# Altium PCB DATALOGER_RevA.PcbDoc (part 3 of 3)
Units mil, origin at the board's own origin, x right, y up, seen from the top; angles counter-clockwise.
Board outline 3937.01 x 3149.61 mil, 2 copper layers (Top Layer, Bottom Layer), stack 62.19 mil thick; 129 components, 81 nets, 422 pads, 180 vias.
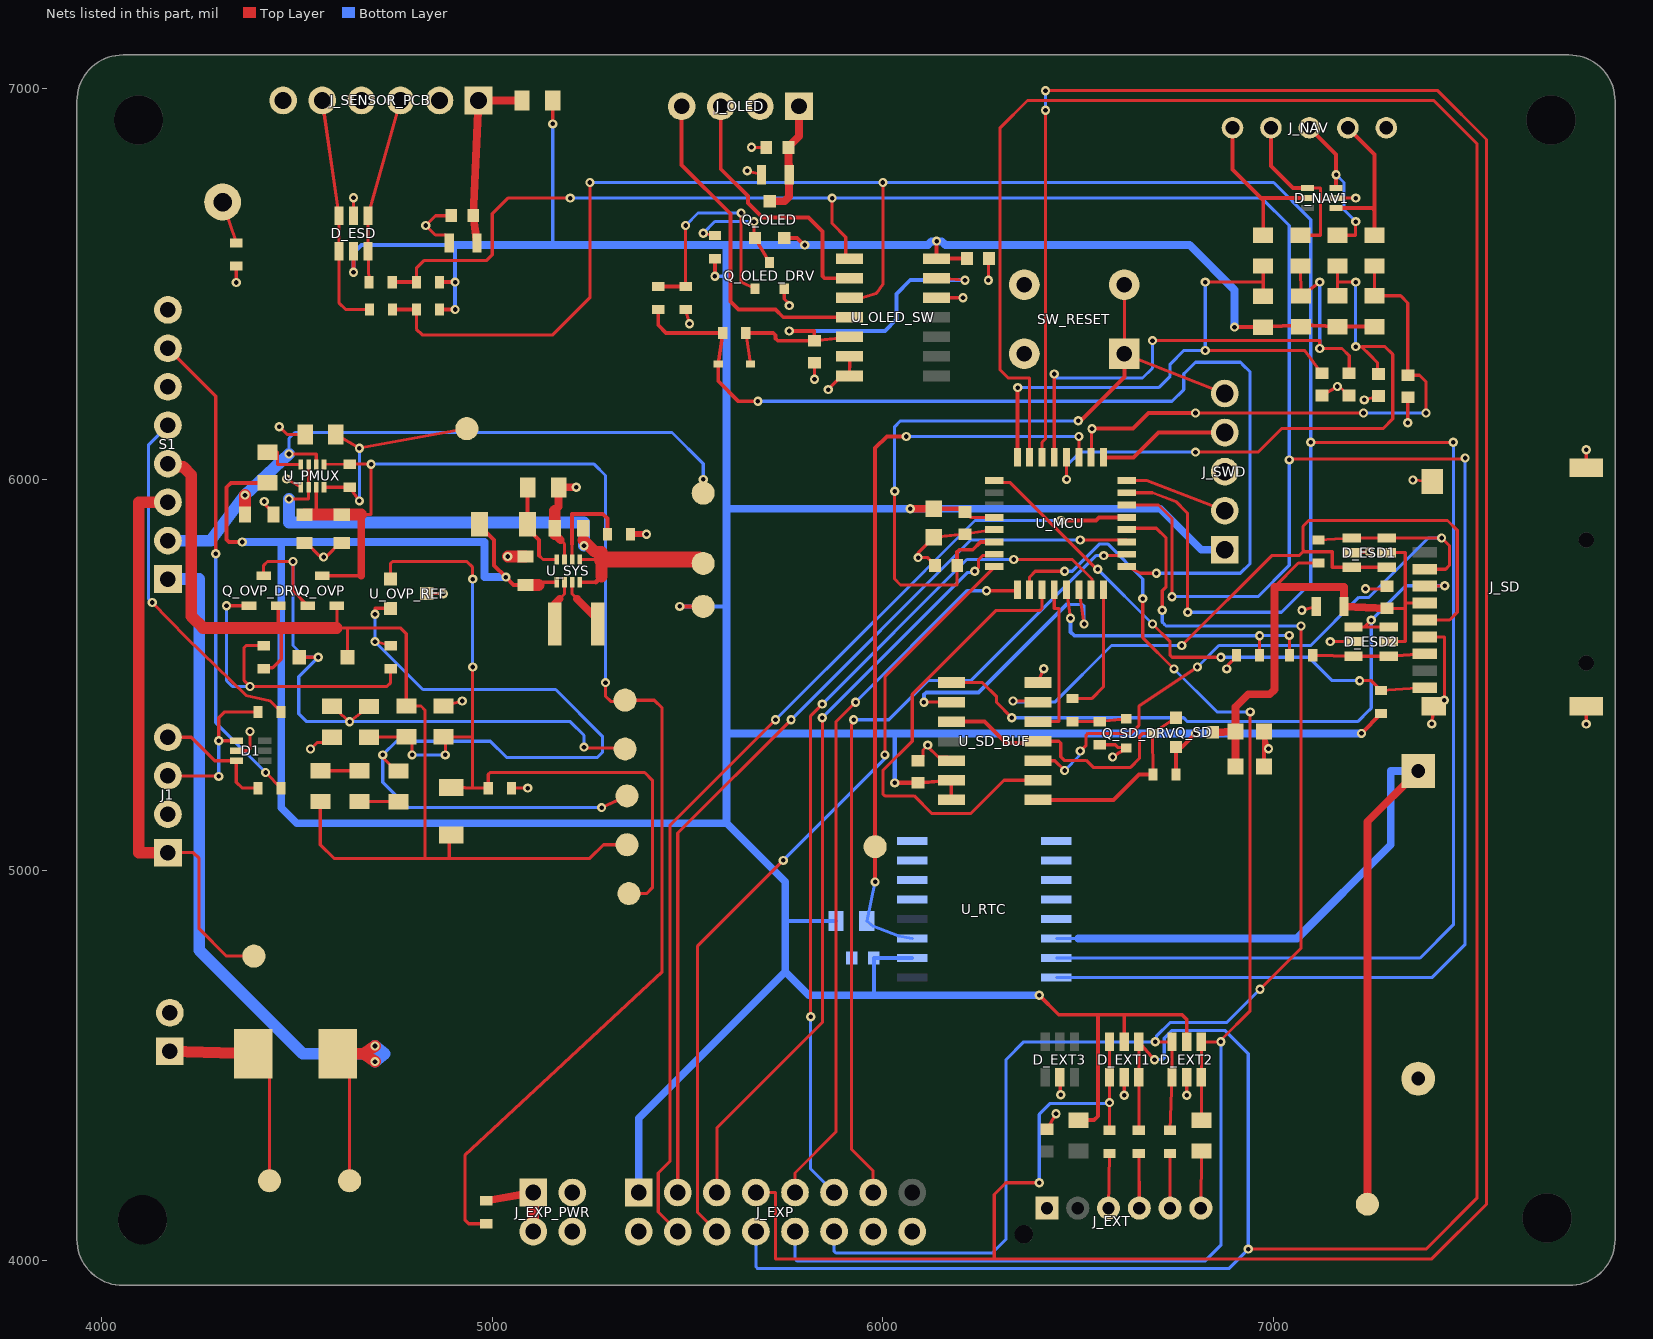
[diagram p2: the nets of this part, all layers, seen from the top]

## Via types
v1: diameter 23.62, hole 11.81, Top Layer to Bottom Layer, 180 vias

## Nets (pads, with @x,y where several pads share a name; then routed paths per layer and width w, separated by ;. In a path a pad name is that pad's centre, name@x,y a point inside that pad or via, vN(x,y) a via of type N, cw(c..) or ccw(c..) an arc to the next point about the centre after c; other vN are vias at no path point) (continued)
3V3_SYS: C_4066.1 C_BUF.2 C_MCU_BULK.2 C_MCU_HF.2 C_OUT.1 C_RTC.1 D_ESD.5 D_EXT1.5 D_EXT2.5 FB_SENSOR.1 J_EXP.1 J_SWD.1 Q_OLED.2 Q_SD.2 R_CD_PU.1 R_EXT_REF.1 R_FB_TOP.1 R_GATE.2 R_OLED_GATE.2 R_PULL1.2 R_PULL2.2 R_PULL3.2 R_PULL4.2 R_RTC_INT_PU.1 R_SCL_PU.2 R_SDA_PU.2 R_ST_PU.1 TP_3V3_SYS.1 U_MCU.4 U_OLED_SW.14 U_RTC.2 U_SD_BUF.13 U_SD_BUF.14 U_SYS.1 | length 15307.8
  Top Layer w8: 5125,5736.73 U_SYS.1@5165.31,5736.73 ; C_MCU_HF.2@6210,5916.69 6223.7,5902.99 U_MCU.4@6285,5902.99
  Top Layer w10: v1(4360,5840) 4325.86,5840 4320,5845.86 4320,5980 4331.26,5991.26 R_ST_PU.1@4425,5991.26 ; v1(4645,6530) D_ESD.5@4645,6584.45 ; R_SDA_PU.2@4865,6435 v1(4905,6435) ; R_SCL_PU.2@4865,6505 v1(4905,6505) ; R_FB_TOP.1@4967.95,5885 4965,5885 5005,5845 5005,5780 v1(5035,5750) 5055,5730 C_OUT.1@5085,5730 ; v1(5155,6910) FB_SENSOR.1@5155,6970 ; v1(5480,5675) TP_3V3_SYS.1@5540,5675 ; v1(5570,6520) R_OLED_GATE.2@5570,6565 ; Q_OLED.2@5747.4,6617.76 5779.84,6617.76 5797.6,6600 v1(5800,6600) ; C_BUF.2@6090,5223.31 U_SD_BUF.13@6175,5230 U_SD_BUF.14@6175,5180 ; v1(6137.44,6610) U_OLED_SW.14@6137.44,6565 C_4066.1@6215,6565 ; v1(6400,4680) 6450,4630 6550,4630 ; R_EXT_REF.1@6500,4360 6540,4360 6550,4370 6550,4630 ; D_EXT1.5@6617.6,4560.55 6617.6,4630 ; R_GATE.2@6750,5245 Q_SD.2@6750,5315.2 6765,5315.2 v1(6800,5350) ; D_EXT2.5@6777.6,4560.55 6777.6,4617.4 6765,4630 6617.6,4630 ; v1(6900,6390) R_PULL4.2@6973.43,6390 ; R_PULL4.2@6973.43,6390 6994.02,6391.08 7049.41,6394 R_PULL3.2@7070,6390.63 ; R_PULL3.2@7068.43,6395 7070.17,6394.93 R_PULL2.2@7163.43,6391.26 R_PULL1.2@7258.43,6391.26 ; v1(7225,5350) R_CD_PU.1@7275,5400.94 ; 6550,4630 6617.6,4630
  Top Layer w12: 5118.27,5730 5125,5736.73 ; v1(6030,5223.31) C_BUF.2@6090,5223.31 ; C_MCU_BULK.2@6130,5925 6201.69,5925 C_MCU_HF.2@6210,5916.69
  Top Layer w20: v1(6070,5925) C_MCU_BULK.2@6130,5925
  Top Layer w30: C_OUT.1@5085,5730 5118.27,5730
  Bottom Layer w10: v1(4645,6530) 4645,6580 4665,6600 4905,6600 v1(4905,6505) v1(4905,6435) ; 5155,6600 v1(5155,6910) ; v1(5480,5675) 5600,5675 ; v1(5570,6520) 5600,6520 ; 5750,4870 R_RTC_INT_PU.1@5880,4870 ; 5976.69,4680 C_RTC.1@5976.69,4775 U_RTC.2@6075,4775
  Bottom Layer w12: v1(6030,5223.31) 6030,5350
  Bottom Layer w20: v1(4360,5840) 4460,5840 ; 4905,6600 5155,6600 5600,6600 ; v1(5035,5750) 4980,5750 4980,5840 4460,5840 ; J_EXP.1@5375,4175 5375,4365 5750,4740 ; v1(6400,4680) 5976.69,4680 5810,4680 5750,4740 ; J_SWD.1@6875,5820 6815,5820 6710,5925 v1(6070,5925) 5600,5925 ; v1(6900,6390) 6900,6485 6785,6600 6160,6600 6150.69,6609.31 6138.13,6609.31 v1(6137.44,6610) 6136.75,6609.31 6124.31,6609.31 6115,6600 5600,6600 ; v1(7225,5350) v1(6800,5350) 6030,5350 5600,5350 ; 4460,5840 4460,5160 4500,5120 5600,5120 ; 5600,5120 5750,4970 5750,4870 5750,4740 ; 5600,5120 5600,5350 ; 5600,5350 5600,5675 5600,5925 ; 5600,5925 5600,6520 5600,6600
BAT_FUSED: F1.1 S1.1 TP_BAT_FUSED.1 | length 2140.9
  Top Layer w8: F1.1@4605,4530 4635,4530 TP_BAT_FUSED.1@4635,4205
  Top Layer w30: F1.1@4635,4530 4670,4530 ; v1(4700,4510) 4670,4530 ; v1(4700,4550) 4670,4530
  Bottom Layer w30: S1.1@4170,5745 4250,5745 4250,4795 4515,4530 4725,4530 ; v1(4700,4510) 4725,4530 ; v1(4700,4550) 4725,4530
BAT_RAW: BT1.1 F1.2 TP_BAT_RAW.1 | length 580.1
  Top Layer w8: F1.2@4388.46,4530 4430,4530 TP_BAT_RAW.1@4430,4205
  Top Layer w30: BT1.1@4175,4536.57 F1.2@4388.46,4530
BAT_SW: C1.1 S1.2 TP_BAT_SW.1 U_PMUX.6 | length 1770.5
  Top Layer w8: v1(4480,6065) 4549.69,6065 U_PMUX.6@4549.69,6038.27 ; TP_BAT_SW.1@5540,5965 v1(5540,6000)
  Top Layer w30: C1.1@4367.17,5910 v1(4367.16,5960)
  Bottom Layer w8: v1(4480,6065) 4480,6105 4495,6120 5460,6120 5540,6040 v1(5540,6000)
  Bottom Layer w30: S1.2@4170,5843.43 4280,5843.43 v1(4367.16,5960) v1(4480,6065)
CC1_RD_RET: R_CC1.2 S1.5 | length 918.7
  Top Layer w8: v1(4130,5685) 4217.5,5595 4370,5447.5 4432.5,5432.5 R_CC1.2@4459.53,5405
  Bottom Layer w8: v1(4130,5685) 4120,5695 4120,6087.5 S1.5@4170,6138.7
CC2_RD_RET: R_CC2.2 S1.7 | length 1245.3
  Top Layer w8: S1.7@4170,6335.55 4292.5,6213.05 v1(4292.5,5810) ; v1(4420,5250) R_CC2.2@4459.53,5210
  Bottom Layer w8: v1(4292.5,5810) 4292.5,5377.5 v1(4420,5250)
EXP_ID_ADC: J_EXP.9 U_MCU.9 | length 1855.4
  Top Layer w8: J_EXP.9@5775,4175 5775,4225 5880,4330 5880,5380 v1(5930,5430) ; v1(6265,5715) 6345,5715 U_MCU.9@6344.06,5717.95
  Bottom Layer w8: v1(5930,5430) 6215,5715 v1(6265,5715)
FB_3V3: R_FB_BOTTOM.2 R_FB_TOP.2 U_SYS.8 | length 238.1
  Top Layer w8: 5120,5805 5130,5795 U_SYS.8@5165.31,5795
  Top Layer w10: R_FB_BOTTOM.2@5091.26,5980 5090,5980 R_FB_TOP.2@5090,5885 5090,5875 5120,5845 5120,5805
GND: BT1.2 BT2.2 C1.2 C_4066.2 C_BUF.1 C_DELAY.2 C_EXT_REF.2 C_FIL1.2 C_FIL2.2 C_FIL3.2 C_FIL4.2 C_IN.1 C_MCU_BULK.1 C_MCU_HF.1 C_NRST.2 C_OLED_BULK.1 C_OLED_HF.1 C_OUT.2 C_RTC.2 C_SD_BULK1.1 C_SD_BULK2.1 C_SD_HF.1 C_SD_MID.1 C_SENSOR_BULK.1 C_SENSOR_HF.1 C_USB1.1 C_USB2.1 D1.2 D_ESD1.2 D_ESD2.2 D_ESD.2 D_EXT1.2 D_EXT2.2 D_EXT3.2 D_NAV1.2 J1.2 J_EXP.2 J_EXP.14 J_EXP.16 J_EXP_PWR.3 J_EXP_PWR.4 J_EXT.1 J_NAV.1 J_OLED.2 J_SD.6 J_SD.10 J_SENSOR_PCB.2 J_SENSOR_PCB.4 J_SENSOR_PCB.6 J_SWD.3 Q_OLED_DRV.2 Q_SD_DRV.2 R_BASE_PD.1 R_BOTTOM_A.1 R_BOTTOM_B.2 R_FB_BOTTOM.1 R_GATE_PD.2 R_MISO_PD.2 R_MODE.1 R_OLED_BASE_PD.2 R_PR_BOTTOM.2 R_SHIELD.1 S1.6 S1.8 SW_RESET.3 SW_RESET.4 U_MCU.5 U_OLED_SW.6 U_OLED_SW.7 U_OLED_SW.12 U_OVP_REF.3 U_PMUX.1 U_RTC.5 U_RTC.6 U_RTC.7 U_RTC.8 U_RTC.9 U_RTC.10 U_RTC.11 U_RTC.12 U_RTC.13 U_SD_BUF.7 U_SD_BUF.12 U_SYS.7 | length 3385.7
  Top Layer w8: D1.2@4345,5305.59 4375,5305.59 4380,5310.59 v1(4380,5355) ; v1(4345,6503.94) R_SHIELD.1@4345,6545.94 ; v1(4416.49,5943.51) 4419.48,5940.52 4419.48,5935.44 4440,5914.92 C1.2@4440,5910 ; v1(4455,6135) 4475,6115 R_PR_BOTTOM.2@4521.26,6115 ; v1(4474.08,6001.24) U_PMUX.1@4510.31,5980 ; C_USB1.1@4524.92,5837.16 4557.6,5804.48 4565.52,5804.48 v1(4568.51,5801.49) 4571.49,5804.48 4577.4,5804.48 4610.08,5837.16 C_USB2.1@4615,5837.17 ; v1(4535,5310) 4551.84,5326.84 4576.21,5326.84 R_GATE_PD.2@4590,5340.63 ; D_ESD.2@4645,6675 v1(4645,6721) ; U_OVP_REF.3@4832.52,5707.6 v1(4874.52,5707.6) ; R_BOTTOM_A.1@4875,5420 v1(4923.3,5432.94) ; C_SENSOR_BULK.1@4890,6605 4890,6617.8 4882.19,6625.61 4854.39,6625.61 v1(4830,6650) 4855,6675 C_SENSOR_HF.1@4895,6675 ; R_BOTTOM_B.2@5049.06,5210 v1(5091.06,5210) ; 5175,5845 5185,5835 U_SYS.7@5185,5795 ; R_OLED_BASE_PD.2@5495,6435 v1(5504.84,6398.3) ; v1(5652.86,6789.84) C_OLED_BULK.1@5689.57,6780 ; v1(5663.65,6850) C_OLED_HF.1@5701.65,6850 ; Q_OLED_DRV.2@5747.4,6488.07 5747.4,6461.83 5760,6449.23 v1(5760,6445) ; v1(5825,6256.31) C_DELAY.2@5825,6298.31 ; v1(5860,6230) 5860,6230.67 U_OLED_SW.7@5887.17,6257.83 ; U_OLED_SW.7@5915,6265 5915,6257.83 U_OLED_SW.7@5887.17,6257.83 ; U_OLED_SW.6@5915,6315 5915,6286.18 5914.92,6286.09 5914.92,6274.78 5898.48,6258.34 5887.17,6258.34 U_OLED_SW.7@5887.17,6257.83 ; C_BUF.1@6090,5280 6091.77,5280 6102.73,5290.96 6102.73,5307.5 6112.89,5317.66 6112.89,5317.89 v1@6115,5315.79 ; v1(6115,5320) v1@6115,5315.79 ; C_NRST.2@6133.31,5780 6133.31,5781.77 6115.08,5800 v1(6090,5800) 6090,5812.17 C_MCU_BULK.1@6130,5852.17 C_MCU_HF.1@6210,5860 U_MCU.5@6285,5871.5 ; U_OLED_SW.12@6137.44,6465 v1(6205,6465) ; U_SD_BUF.12@6175,5280 6165.22,5289.78 6141.01,5289.78 v1@6115,5315.79 ; v1(6270,6510) 6270,6563.31 C_4066.2@6271.69,6565 ; U_SD_BUF.7@6397.44,5480 v1(6411.4,5515.34) ; C_EXT_REF.2@6420,4336.69 v1(6443,4376.53) ; D_EXT3.2@6452.6,4470 6453.8,4468.8 6453.8,4426.2 v1(6455,4425) ; R_BASE_PD.1@6555,5320.94 6594.68,5320.94 6601.98,5313.65 6622.02,5313.65 Q_SD_DRV.2@6623.07,5312.6 v1(6587.92,5289.61) ; v1(6617.6,4424) D_EXT1.2@6617.6,4470 ; v1(6777.6,4424) D_EXT2.2@6777.6,4470 ; v1(6880,5515) 6882.99,5517.99 6882.99,5524.05 6905,5546.06 R_MISO_PD.2@6905,5550 ; C_SD_BULK1.1@6975,5355 v1(6986.91,5310.57) ; v1(7072.43,5665.16) C_SD_MID.1@7109.13,5675 ; C_FIL4.2@7123.43,6215 v1(7163.26,6238) 7168.65,6238 7191.65,6215 C_FIL3.2@7193.43,6215 ; v1(7145,5585) D_ESD2.2@7204.45,5585 ; D_NAV1.2@7159.84,6720 v1(7210,6720) ; D_ESD1.2@7199.45,5812.6 7200.65,5813.8 7243.8,5813.8 v1(7245,5815) ; v1(7231.72,6203.51) C_FIL2.2@7268.43,6213.35 ; v1(7235,5720) 7283.31,5720 C_SD_HF.1@7290,5726.69 ; v1(7343.43,6145) C_FIL1.2@7343.43,6210 ; v1(7356.45,5998.53) J_SD.10@7406.3,5994.69 ; J_SD.6@7386.61,5597.05 7436.88,5597.05 v1(7436.88,5434.65) ; v1(7404.67,5374.22) J_SD.10@7410.24,5419.88 ; v1(7800,5373.88) J_SD.10@7800,5419.88 ; J_SD.10@7800,6030.12 v1(7800,6076.12)
  Top Layer w10: C_SD_BULK2.1@6975,5265 C_SD_BULK1.1@6975,5355
  Top Layer w15: R_MODE.1@5354.06,5860 v1(5395,5860)
  Top Layer w20: C_IN.1@5160,5860 5175,5845 ; 5160,5920 5170,5930 R_FB_BOTTOM.1@5170,5980 v1(5215,5980)
  Top Layer w30: v1(5040,5802.83) C_OUT.2@5085,5802.83 ; C_IN.1@5160,5860 C_IN.1@5160,5875 5160,5920
I2C1_SCL: D_EXT1.1 D_EXT1.6 J_EXP.7 R_EXT_SCL.2 U_MCU.30 | length 7832.6
  Top Layer w8: J_EXP.7@5675,4175 5725,4175 5725,4005 6285,4005 ; v1(6400,4200) 6314.69,4200 6310,4195.31 6310,4195 6285,4170 6285,4005 ; U_MCU.30@6407.05,6056.54 6407,6095 6416,6104 v1(6416,6945) ; v1(6416,6995) 7420,6995 7545,6870 7545,4145 7405,4005 6285,4005 ; R_EXT_SCL.2@6580,4334.06 v1(6580,4405) 6580.1,4405.1 6580.1,4469.9 D_EXT1.1@6580.2,4470 D_EXT1.6@6580.2,4560.55
  Bottom Layer w8: v1(6400,4200) 6400,4375 6428.19,4403.19 6578.19,4403.19 v1(6580,4405) ; v1(6416,6945) v1(6416,6995)
I2C1_SDA: D_EXT1.3 D_EXT1.4 J_EXP.8 R_EXT_SDA.1 U_MCU.31 | length 8025.9
  Top Layer w8: U_MCU.31@6375.55,6056.54 6375,6260 6320,6260 6300,6280 6300,6900 6370,6970 7410,6970 7520.31,6859.69 7520.31,4160.31 7390,4030 v1(6935,4030) ; R_EXT_SDA.1@6655,4334.06 D_EXT1.3@6655,4470 D_EXT1.4@6655,4560.55 v1(6695,4515)
  Bottom Layer w8: J_EXP.8@5675,4075 5675,3984.69 5679.69,3980 6885,3980 v1(6935,4030) 6935,4530 6875,4590 6740,4590 6720,4570 6720,4519.69 6715.31,4515 v1(6695,4515)
I2C2_SCL: R_SCL_PU.1 R_SCL_SER.2 U_MCU.22 U_OLED_SW.1 U_RTC.16 | length 6982.5
  Top Layer w8: R_SCL_PU.1@4805.94,6505 4805.94,6540.94 4825,6560 4985,6560 5000,6575 5000,6680 5040,6720 v1(5200,6720) ; v1(5870,6720) 5870,6655 5905,6620 5905,6574.78 U_OLED_SW.1@5915,6565 ; U_MCU.22@6623.58,5934.49 6705.51,5934.49 6740,5900 v1(6740,5700) ; v1(7040,6050) 7042.5,6052.5 7487.5,6052.5 v1(7490,6055)
  Top Layer w10: R_SCL_SER.2@4744.06,6505 R_SCL_PU.1@4805.94,6505
  Bottom Layer w8: v1(5200,6720) v1(5870,6720) 6970,6720 7040,6650 7040,5780 6960,5700 v1(6740,5700) ; U_RTC.16@6443.9,4725 7405,4725 7490,4810 v1(7490,6055)
I2C2_SDA: R_SDA_PU.1 R_SDA_SER.2 U_MCU.23 U_OLED_SW.3 U_RTC.15 | length 7492.6
  Top Layer w8: R_SDA_PU.1@4805.94,6435 4805.94,6384.69 4820.63,6370 5155,6370 5250,6465 v1(5250,6760) ; U_OLED_SW.3@5915,6465 5945.45,6464.84 5981.96,6475.58 5983.8,6477.42 6000,6499.07 v1(6000,6760) ; U_MCU.23@6623.58,5965.98 6690,5965.98 6748.98,5943.06 6750.54,5942.45 6774.9,5918.1 6780,5912.99 v1(6780,5660) ; v1(7095,6095) v1(7460,6095)
  Top Layer w10: R_SDA_SER.2@4745,6435 R_SDA_PU.1@4805.94,6435
  Bottom Layer w8: v1(5250,6760) v1(6000,6760) 7000,6760 7095,6665 v1(7095,6095) 7095,5735 7020,5660 v1(6780,5660) ; U_RTC.15@6443.9,4775 7375,4775 7460,4860 v1(7460,6095)
JEXT_CTRL_RAW: J_EXT.5 R_EXT_CTRL.2 | length 140
  Top Layer w8: J_EXT.5@6734.96,4135 R_EXT_CTRL.2@6735,4275
JEXT_IN_RAW: J_EXT.6 R_EXT_IN.2 | length 146.3
  Top Layer w8: J_EXT.6@6813.7,4135 R_EXT_IN.2@6815,4281.26
JEXT_SCL_RAW: J_EXT.3 R_EXT_SCL.1 | length 140
  Top Layer w8: J_EXT.3@6577.48,4135 R_EXT_SCL.1@6580,4275
JEXT_SDA_RAW: J_EXT.4 R_EXT_SDA.2 | length 140
  Top Layer w8: R_EXT_SDA.2@6655,4275 J_EXT.4@6656.22,4135
KEY_BACK: C_FIL4.1 R_PULL4.1 R_SER4.2 U_MCU.32 | length 1444.9
  Top Layer w8: v1(6825,6330) 7080,6330 C_FIL4.1@7123.43,6271.69 ; v1(6825,6505) 6973.43,6505 ; R_PULL4.1@6973.43,6468.74 6973.43,6505 ; R_SER4.2@6973.43,6546.26 6973.43,6505
  Top Layer w10: U_MCU.32@6344.06,6056.54 6344.53,6057.01 6344.53,6234.53 v1(6345,6235)
  Bottom Layer w8: v1(6345,6235) 6705.58,6235 6735,6264.42 6735,6295.19 6769.81,6330 v1(6825,6330) v1(6825,6505)
KEY_DOWN: C_FIL2.1 R_PULL2.1 R_SER2.2 U_MCU.28 | length 1619
  Top Layer w8: v1(6470.04,6000) U_MCU.28@6470.04,6056.54 ; v1(6800,6070) 6960,6070 7020,6130 7280,6130 7305,6155 7305,6320 7285,6340 7226.34,6340 ; R_PULL2.1@7163.43,6470 7163.43,6505 ; R_SER2.2@7163.43,6546.26 7163.43,6505 ; v1(7210,6340) 7211.34,6338.66 7226.34,6338.66 7245,6320 7265.95,6299.04 7265.95,6272.51 C_FIL2.1@7268.43,6270.04 ; v1(7210,6505) 7163.43,6505
  Bottom Layer w8: v1(6470.04,6000) 6470.04,6035.04 6505,6070 v1(6800,6070) ; v1(7210,6340) v1(7210,6505)
KEY_SET: C_FIL3.1 R_PULL3.1 R_SER3.2 U_MCU.29 | length 1439.4
  Top Layer w8: U_MCU.29@6438.54,6056.54 v1(6438.54,6270) ; v1(6690,6355.4) 7118,6355.4 v1(7118,6335) 7175,6335 7193.43,6316.57 C_FIL3.1@7193.43,6271.69 ; R_SER3.2@7068.43,6546.26 R_PULL3.1@7070,6469.37 v1(7118,6505)
  Bottom Layer w8: v1(6438.54,6270) 6438.54,6259.54 6664.54,6259.54 6690,6285 v1(6690,6355.4) ; v1(7118,6335) v1(7118,6505)
KEY_UP: C_FIL1.1 R_PULL1.1 R_SER1.2 U_MCU.26 | length 1433.1
  Top Layer w8: U_MCU.26@6533.03,6056.54 6534.02,6057.52 6534.02,6129.02 v1(6535,6130) ; v1(6800,6170) v1(7230,6170) ; R_SER1.2@7258.43,6546.26 R_PULL1.1@7258.43,6470 7325,6470 7343.43,6451.57 C_FIL1.1@7343.43,6266.69 7373.31,6266.69 7390,6250 v1(7390,6170)
  Top Layer w10: v1(6535,6130) 6640,6130 6680,6170 v1(6800,6170)
  Bottom Layer w8: v1(7230,6170) v1(7390,6170)
MODE_PFM: R_MODE.2 U_SYS.6 | length 252.3
  Top Layer w8: U_SYS.6@5204.69,5795 5204.69,5835
  Top Layer w10: 5204.69,5835 5204.69,5912 5283,5912 5295,5900 R_MODE.2@5295,5860
NetD_NAV1_1: D_NAV1.1 J_NAV.2 R_SER1.1 | length 404.4
  Top Layer w10: D_NAV1.1@7159.84,6694.41 7252.57,6694.41 7258.43,6688.55 ; J_NAV.2@7190,6900 7258.43,6831.57 7258.43,6688.55 ; R_SER1.1@7258.43,6625 7258.43,6688.55
NetD_NAV1_3: D_NAV1.3 J_NAV.3 R_SER2.1 | length 405.1
  Top Layer w8: R_SER2.1@7163.43,6625 7210,6625 v1(7210,6660)
  Top Layer w10: J_NAV.3@7091.57,6900 7159.84,6831.73 D_NAV1.3@7159.84,6745.59
  Bottom Layer w8: v1(7159.84,6780) 7180,6760 7180,6690 v1(7210,6660)
NetD_NAV1_4: D_NAV1.4 J_NAV.4 R_SER3.1 | length 420.5
  Top Layer w8: R_SER3.1@7068.43,6625 7120,6625 7120,6745.59 D_NAV1.4@7087.01,6745.59
  Top Layer w10: J_NAV.4@6993.15,6900 6993.15,6801.85 7049.41,6745.59 D_NAV1.4@7087.01,6745.59
NetD_NAV1_5: D_NAV1.5 J_NAV.5 R_SER4.1 | length 427
  Top Layer w10: J_NAV.5@6894.72,6900 6894.72,6792.84 6967.57,6720 ; R_SER4.1@6973.43,6625 6973.43,6714.14 6967.57,6720 ; D_NAV1.5@7087.01,6720 6967.57,6720
NetJ_SHIELD_1: J_SHIELD.1 R_SHIELD.2 | length 110.7
  Top Layer w8: J_SHIELD.1@4310,6710 R_SHIELD.2@4345,6605
NetL1_1: L1.1 U_SYS.3 | length 133.9
  Top Layer w8: U_SYS.3@5204.69,5736.73 5204.69,5706.73 5216.69,5694.73
  Top Layer w20: 5216.69,5694.73 5270.24,5641.18 L1.1@5270.24,5630
NetL1_2: L1.2 U_SYS.2 | length 117.1
  Top Layer w8: 5173,5694.73 5185,5706.73 U_SYS.2@5185,5736.73
  Top Layer w20: L1.2@5160,5630 5160,5681.73 5173,5694.73
NetQ_OLED_1: Q_OLED.1 Q_OLED_DRV.3 R_OLED_GATE.1 | length 289.4
  Top Layer w8: v1(5540,6630) R_OLED_GATE.1@5570,6624.06 ; v1(5670,6660) 5670,6620.35 Q_OLED.1@5672.6,6617.76 Q_OLED_DRV.3@5710,6555
  Bottom Layer w8: v1(5540,6630) 5570,6660 v1(5670,6660)
NetQ_OLED_DRV_1: Q_OLED_DRV.1 R_OLED_BASE.2 R_OLED_BASE_PD.1 | length 597.4
  Top Layer w8: R_OLED_BASE_PD.1@5495,6494.06 v1(5495,6650) ; v1(5637,6681.81) 5637,6505 Q_OLED_DRV.1@5672.6,6488.07
  Top Layer w10: R_OLED_BASE.2@5425,6494.06 R_OLED_BASE_PD.1@5495,6494.06
  Bottom Layer w8: v1(5495,6650) 5526.81,6681.81 v1(5637,6681.81)
NetR_K1_1: R_K1.1 R_K2.2 | length 100
  Top Layer w8: R_K2.2@4660,5175.63 R_K1.1@4760,5175
NetR_K2_1: R_K2.1 R_K3.2 | length 100
  Top Layer w8: R_K3.2@4560,5254.37 R_K2.1@4660,5254.37
NRST: C_NRST.1 J_SWD.5 SW_RESET.1 SW_RESET.2 U_MCU.6 | length 1899.5
  Top Layer w8: v1(6030,5970) 6030,5745 6045,5730 6190,5730 C_NRST.1@6190,5780 ; SW_RESET.2@6617.95,6498.58 SW_RESET.1@6617.95,6321.42 J_SWD.5@6875,6220
  Top Layer w10: C_NRST.1@6190,5780 6190,5814.14 6195.86,5820 6230,5820 6250,5840 U_MCU.6@6285,5840 ; v1(6500,6150) 6502.61,6152.61 6508.51,6152.61 6617.95,6262.05 SW_RESET.1@6617.95,6321.42
  Bottom Layer w8: v1(6030,5970) 6030,6135 6045,6150 v1(6500,6150)
OLED_BUS_EN: C_DELAY.1 D_DELAY.2 R_DELAY.2 U_OLED_SW.5 U_OLED_SW.13 | length 1063
  Top Layer w8: R_DELAY.2@5649.06,6375 D_DELAY.2@5661.54,6295 ; C_DELAY.1@5825,6355 U_OLED_SW.5@5915,6365 ; U_OLED_SW.13@6137.44,6515 v1(6210,6510)
  Top Layer w10: R_DELAY.2@5649.06,6375 5719.14,6375 5725,6369.14 5725,6360.86 5730.86,6355 5823.28,6355 5824.14,6355.86 5824.14,6380 v1(5760,6380)
  Bottom Layer w10: v1(5760,6380) 6005,6380 6035,6410 6035,6475 6070,6510 v1(6210,6510)
OLED_CTL: D_DELAY.1 R_DELAY.1 R_OLED_BASE.1 U_MCU.17 | length 2616.6
  Top Layer w8: D_DELAY.1@5578.46,6295 R_DELAY.1@5590,6375 ; U_MCU.17@6623.58,5777.01 6660,5760 v1(6700,5760)
  Top Layer w10: R_OLED_BASE.1@5425,6435 5425,6395 5445,6375 R_DELAY.1@5590,6375 ; D_DELAY.1@5578.46,6295 5578.46,6251.54 5630,6200 v1(5680,6200)
  Bottom Layer w8: v1(5680,6200) 6740,6200 6770,6230 6770,6270.31 6774.69,6275 6775,6275 6800,6300 6915.31,6300 6920,6295.31 6920,6295 6940,6275 6940,5785 6915,5760 v1(6700,5760)
OLED_SCL: J_OLED.3 U_OLED_SW.2 | length 683.2
  Top Layer w10: J_OLED.3@5585,6955 5585,6795 5655,6725 5655,6707.26 5692.26,6670 5810,6670 5845,6635 5845,6520.86 5850.86,6515 U_OLED_SW.2@5915,6515
OLED_SDA: J_OLED.4 U_OLED_SW.4 | length 873.3
  Top Layer w10: J_OLED.4@5485,6955 5485,6805 5610,6680 5610,6455 5630,6435 5725,6435 5745,6415 U_OLED_SW.4@5915,6415
OLED_VDD: C_OLED_BULK.2 C_OLED_HF.2 J_OLED.1 Q_OLED.3 | length 297.6
  Top Layer w20: Q_OLED.3@5710,6712.24 5748.28,6712.24 5760,6723.96 5760,6805 5758.35,6806.65 C_OLED_HF.2@5758.35,6850 5758.35,6851.77 5785,6878.43 J_OLED.1@5785,6955
OVP_BASE: Q_OVP_DRV.1 R_BASE.1 R_BE_PU.2 | length 873
  Top Layer w8: v1(4320,5676.61) Q_OVP_DRV.1@4377.6,5676.61 ; R_BE_PU.2@4415,5574.53 4369.69,5574.53 4365,5569.84 4365,5485 v1(4380,5470) 4730,5470 4740,5480 R_BASE.1@4740,5515.47
  Bottom Layer w8: v1(4320,5676.61) 4320,5485 4335,5470 v1(4380,5470)
OVP_GATE: Q_OVP.1 Q_OVP_DRV.3 R_GATE_PD.1 R_HYST.1 TP_QG.1 Z_OVP.2 | length 1754.5
  Top Layer w8: Q_OVP_DRV.3@4415,5753.39 4415,5780 4425,5790 v1(4490,5790) 4490,5715 Q_OVP.1@4527.6,5676.61 ; Z_OVP.2@4505.98,5545 v1(4555,5545) ; R_GATE_PD.1@4590,5419.37 v1(4635,5380) R_HYST.1@4685,5418.74 ; v1(5235,5315) 5237.5,5312.5 5337.5,5312.5 TP_QG.1@5340,5310
  Bottom Layer w8: v1(4490,5790) 4490,5575 4520,5545 v1(4555,5545) 4505,5495 4505,5400 4525,5380 v1(4635,5380) 5200,5380 5235,5345 v1(5235,5315)
OVP_K: R_BASE.2 R_K1.2 TP_OVP_K.1 U_OVP_REF.2 | length 2279.3
  Top Layer w8: v1(4700,5585) R_BASE.2@4740,5574.53 ; v1(4700,5655) 4700,5670.2 U_OVP_REF.2@4740,5670.2 ; v1(4720,5295) 4722.99,5292.01 4722.99,5284.85 4754.09,5253.74 R_K1.2@4760,5253.74 ; v1(5280,5160) TP_OVP_K.1@5345,5190
  Bottom Layer w8: v1(4700,5655) v1(4700,5585) 4822.5,5462.5 5162.3,5462.5 5281.81,5342.99 5281.81,5300.97 5269.03,5288.19 5036.85,5288.19 4995.04,5330 4755,5330 v1(4720,5295) 4720,5225 4785,5160 v1(5280,5160)
OVP_REF: R_BOTTOM_A.2 R_BOTTOM_B.1 R_HYST.2 R_TOP_A.1 R_TOP_B.2 TP_OVP_REF.1 U_OVP_REF.1 | length 2089.8
  Top Layer w8: R_HYST.2@4685,5340 R_TOP_A.1@4780,5341.26 4785.91,5341.26 4795,5332.17 v1(4795,5295) ; U_OVP_REF.1@4740,5745 4740,5785.31 4744.69,5790 4935,5790 4950,5775 v1(4950,5745) ; v1(4880,5295) 4880,5331.95 4870.69,5341.26 4950,5341.26 ; R_TOP_B.2@4895,5212.05 4930,5211 4950,5210.67 ; v1(4950,5520) 4950,5341.26 ; TP_OVP_REF.1@5350,4940 5395,4940 5410,4955 5410,5230 5390,5250 4995,5250 4990,5245 R_BOTTOM_B.1@4990,5210 4950,5210.67 ; 4950,5210.67 4950,5341.26
  Bottom Layer w8: v1(4795,5295) v1(4880,5295) ; v1(4950,5520) v1(4950,5745)
PA3: D_EXT2.3 D_EXT2.4 J_EXP.10 R_EXT_IN.1 U_MCU.10 | length 3726.6
  Top Layer w8: U_MCU.10@6375,5715 6375,5750 6390,5765 v1(6465,5765) ; v1(6665,5695) 6665,5595 v1(6745,5515) ; R_EXT_IN.1@6815,4360 D_EXT2.3@6815,4470 D_EXT2.4@6815,4560.55 v1(6865,4560.55) 6867.99,4563.54 6867.99,4567.99 6940,4640 v1(6940,5405)
  Bottom Layer w8: J_EXP.10@5775,4075 5775,4004.69 5779.69,4000 6825,4000 6865,4040 v1(6865,4560.55) ; v1(6465,5765) 6485,5765 6555,5835 6575,5835 6665,5745 v1(6665,5695) ; v1(6745,5515) 6855,5405 v1(6940,5405)
PA8: J_EXP.13 U_MCU.18 | length 2112.6
  Top Layer w8: v1(5925,5385) 5922.01,5382.01 5922.01,5374.51 5920,5372.5 5920,4285 5975,4230 J_EXP.13@5975,4175 ; v1(6565,5805) 6625,5805 U_MCU.18@6623.58,5808.5
  Bottom Layer w8: v1(5925,5385) 6015,5385 6115,5485 6225,5485 6545,5805 v1(6565,5805)
PB0: J_EXP.11 U_MCU.15 | length 2184.8
  Top Layer w8: v1(5815,4625) 5815,5395 v1(5845,5425) ; v1(6335,5795) 6485,5795 6535,5745 6535,5715 U_MCU.15@6533.03,5717.95
  Bottom Layer w8: v1(5815,4625) 5815,4235 J_EXP.11@5875,4175 ; v1(5845,5425) 6215,5795 v1(6335,5795)
PC6: D_EXT2.1 D_EXT2.6 J_EXP.12 R_EXT_CTRL.1 U_MCU.20 | length 3630.3
  Top Layer w8: U_MCU.20@6625,5875 6700,5875 6725,5850 6725,5725 6715,5715 v1(6715,5665) ; v1(6697,4560.55) D_EXT2.6@6740.2,4560.55 D_EXT2.1@6740.2,4470 R_EXT_CTRL.1@6735,4334.06 ; v1(6965,4695) 7070,4800 v1(7070,5625)
  Bottom Layer w8: J_EXP.12@5875,4075 5875,4024.69 5879.69,4020 6280,4020 6315,4055 6315,4515 6360.55,4560.55 v1(6697,4560.55) 6699.99,4563.54 6699.99,4574.99 6735,4610 6880,4610 v1(6965,4695) ; v1(6715,5665) 6715,5634.69 6719.69,5630 6719.69,5629.69 6724.37,5625 v1(7070,5625)
PMUX_PR1: R_PR_BOTTOM.1 R_PR_TOP.2 TP_PR1.1 U_PMUX.4 | length 592.6
  Top Layer w8: U_PMUX.4@4569.37,5980 R_PR_TOP.2@4635,5980 v1(4660,5945) ; R_PR_BOTTOM.1@4600,6115 v1(4660,6080) TP_PR1.1@4935,6130
  Bottom Layer w8: v1(4660,5945) v1(4660,6080)
PMUX_ST: R_ST_PU.2 U_PMUX.8 | length 117
  Top Layer w8: R_ST_PU.2@4425,6070 4450,6070 4450,6038.27 U_PMUX.8@4510.31,6038.27
RTC_INT_N: R_RTC_INT_PU.2 TP_RTC_INT.1 U_MCU.27 U_RTC.3 | length 1926
  Top Layer w8: U_MCU.27@6501.54,6056.54 v1(6501.53,6110)
  Top Layer w10: v1(5980,4970) TP_RTC_INT.1@5980,5060 5980,6080 6010,6110 v1(6060,6110)
  Bottom Layer w8: v1(5980,4970) R_RTC_INT_PU.2@5958.74,4870 5974.43,4856.83 6040.05,4831.43 U_RTC.3@6075,4825 ; v1(6060,6110) v1(6501.53,6110)
SCL_SENSOR: D_ESD.1 D_ESD.6 J_SENSOR_PCB.3 R_SCL_SER.1 | length 476.4
  Top Layer w8: R_SCL_SER.1@4685,6505 D_ESD.6@4682.4,6584.45 D_ESD.1@4682.4,6675 J_SENSOR_PCB.3@4765,6970
SD_CARD_DET_N: J_SD.9 R_CD_PU.2 U_MCU.1 | length 1345
  Top Layer w8: U_MCU.1@6285,5997.48 6290,5992.48 6325,5992.48 6547.48,5770 v1(6550,5770) ; v1(6690,5630) 6735,5585 6735,5550 6740,5545 v1(6865,5545) ; v1(7220,5485) 7250,5485 R_CD_PU.2@7275,5460 J_SD.9@7386.61,5467.13
  Bottom Layer w8: v1(6550,5770) v1(6690,5630) ; v1(6865,5545) 7090,5545 7150,5485 v1(7220,5485)
SD_CLK: D_ESD1.3 D_ESD1.4 J_SD.5 U_SD_BUF.6 | length 2003.3
  Top Layer w8: v1(6332.92,5432.92) 6394.52,5432.92 U_SD_BUF.6@6397.44,5430 ; v1(6765,5575) 6995,5805 7065,5805 7075,5815 7079.69,5815 ; D_ESD1.4@7290,5775.2 7150,5775.2 7150,5815 7079.69,5815 ; J_SD.5@7386.61,5640.35 7450.35,5640.35 7470,5660 7470,5870 7445,5895 7090,5895 7075,5880 7075,5819.69 7079.69,5815
  Bottom Layer w8: v1(6332.92,5432.92) 6335.85,5430 6440,5430 6585,5575 v1(6765,5575)
SD_CMD_DI: D_ESD2.1 D_ESD2.6 J_SD.3 U_SD_BUF.8 | length 1756.1
  Top Layer w8: U_SD_BUF.8@6175,5480 6255,5480 6291.01,5443.99 6291.01,5428.99 v1(6330,5390) ; D_ESD2.1@7204.45,5622.4 7232.4,5622.4 ; v1(7250,5640) 7232.4,5622.4 ; D_ESD2.6@7295,5622.4 7232.4,5622.4 ; J_SD.3@7386.61,5726.97 v1(7438,5728)
  Bottom Layer w8: v1(6330,5390) 6769.61,5390 6779.61,5380 7215,5380 7245,5410 ccw(c7242,5417.42) 7248.66,5412.99 7250,5415 7250,5417.42 v1(7250,5640) 7338,5728 v1(7438,5728)
SD_CS: U_MCU.11 U_SD_BUF.2 | length 1210.7
  Top Layer w8: U_SD_BUF.2@6397.44,5230 6310,5230 6225,5145 6125,5145 6080,5190 6005,5190 6000,5195 6000,5255 6075,5330 6075,5450 6290,5665 6402.36,5665 6407.05,5669.69 U_MCU.11@6407.05,5717.95
SD_DAT0_DO: D_ESD2.3 D_ESD2.4 J_SD.7 R_MISO.1 | length 286.8
  Top Layer w8: R_MISO.1@7100,5550 D_ESD2.3@7204.45,5547.6 D_ESD2.4@7295,5547.6 J_SD.7@7386.61,5553.74
SD_DAT3_CS: D_ESD1.1 D_ESD1.6 J_SD.2 R_CS_PU.1 U_SD_BUF.3 | length 1789.8
  Top Layer w8: U_SD_BUF.3@6397.44,5280 6440,5280 v1(6465,5255) ; v1(6505,5305) 6505.67,5305 6520,5319.33 6520,5345.31 6524.69,5350 6635,5350 6655,5370 6655,5420 v1(6805,5520) ; R_CS_PU.1@7115,5845 D_ESD1.1@7199.45,5850 7430.67,5850 7450,5830.67 7450,5780 7440.28,5770.28 J_SD.2@7386.61,5770.28
  Bottom Layer w8: v1(6465,5255) 6502.01,5292.01 6502.01,5302.01 v1(6505,5305) ; v1(6805,5520) 6860,5575 7095,5575 7218.19,5698.19 7244.03,5698.19 7395.85,5850 v1(7430,5850)
SD_DRV_BASE: Q_SD_DRV.1 R_BASE_PD.2 R_SD_DRV_BASE.1 | length 138.5
  Top Layer w8: R_SD_DRV_BASE.1@6485,5380 R_BASE_PD.2@6555,5380 Q_SD_DRV.1@6623.07,5387.4
SD_GATE: Q_SD.1 Q_SD_DRV.3 R_GATE.1 U_SD_BUF.1 U_SD_BUF.4 U_SD_BUF.10 | length 1154.4
  Top Layer w8: U_SD_BUF.4@6397.44,5330 6450.31,5330 6455,5325.31 6455,5290 6464,5281 6520.11,5281 6537.92,5263.19 6634,5263.19 6656.5,5285.69 6656.5,5341.5 6665,5350 Q_SD_DRV.3@6690,5350 ; R_GATE.1@6690.94,5245 Q_SD_DRV.3@6690,5350 ; Q_SD.1@6750,5390 Q_SD_DRV.3@6690,5350
  Top Layer w10: U_SD_BUF.10@6175,5380 6260,5380 6315,5325 6392.44,5325 U_SD_BUF.4@6397.44,5330 ; U_SD_BUF.1@6397.44,5180 6590,5180 6655,5245 R_GATE.1@6690.94,5245
SD_MISO: R_MISO.2 R_MISO_PD.1 U_MCU.13 | length 774.5
  Top Layer w8: U_MCU.13@6470.04,5717.95 v1(6480,5645) ; R_MISO_PD.1@6964.06,5550 v1(6964.06,5600) ; v1(7040.05,5600.9) 7040.5,5600.45 7040.5,5550.45 R_MISO.2@7040.94,5550
  Bottom Layer w8: v1(6964.06,5600) 6964.5,5600.45 7039.6,5600.45 v1(7040.05,5600.9)
  Bottom Layer w10: v1(6480,5645) 6480,5610 6490,5600 v1(6964.06,5600)
SD_MOSI: U_MCU.14 U_SD_BUF.9 | length 731
  Top Layer w8: v1(6105,5430) U_SD_BUF.9@6175,5430 ; U_MCU.14@6501.54,5717.95 v1(6515,5630)
  Bottom Layer w8: 6470,5680 6510.31,5680 6515,5675.31 v1(6515,5630)
  Bottom Layer w10: v1(6105,5430) 6105,5449.14 6110.86,5455 6245,5455 6470,5680
SD_PWR_CTL: R_SD_DRV_BASE.2 U_MCU.16 | length 340.6
  Top Layer w8: R_SD_DRV_BASE.2@6485,5439.06 6534.06,5439.06 6564.53,5469.53 U_MCU.16@6564.53,5717.95
SD_SCK: U_MCU.12 U_SD_BUF.5 | length 403.1
  Top Layer w8: U_SD_BUF.5@6397.44,5380 6450.57,5380 6450.57,5670 6438.54,5670 U_MCU.12@6438.54,5717.95
SD_VDD: C_SD_BULK1.2 C_SD_BULK2.2 C_SD_HF.2 C_SD_MID.2 D_ESD1.5 D_ESD2.5 J_SD.4 Q_SD.3 R_CS_PU.2 | length 1480.1
  Top Layer w8: 7002.5,5725 7063.44,5785.94 R_CS_PU.2@7115,5785.94 ; C_SD_HF.2@7290,5670 7337,5670 ; D_ESD1.5@7290,5812.6 7337,5812.6 7337,5683.66 ; D_ESD2.5@7295,5585 7337,5585 7337,5670 ; J_SD.4@7386.61,5683.66 7337,5683.66 ; 7337,5670 7337,5683.66
  Top Layer w20: Q_SD.3@6844.49,5352.6 C_SD_BULK1.2@6902.17,5355 ; C_SD_BULK2.2@6902.17,5265 C_SD_BULK1.2@6902.17,5355 ; C_SD_HF.2@7290,5670 C_SD_MID.2@7180,5675 7180,5725 7002.5,5725 7002.5,5462.5 6990,5450 6935,5450 6902.16,5417.16 C_SD_BULK1.2@6902.17,5355
SDA_SENSOR: D_ESD.3 D_ESD.4 J_SENSOR_PCB.5 R_SDA_SER.1 | length 606.2
  Top Layer w8: J_SENSOR_PCB.5@4565,6970 D_ESD.3@4607.6,6675 D_ESD.4@4607.6,6584.45 4607.6,6452.4 4625,6435 R_SDA_SER.1@4685.94,6435
SENSOR_3V3: C_SENSOR_BULK.2 C_SENSOR_HF.2 FB_SENSOR.2 J_SENSOR_PCB.1 | length 477.2
  Top Layer w20: C_SENSOR_BULK.2@4960.87,6605 C_SENSOR_HF.2@4951.69,6675 J_SENSOR_PCB.1@4965,6970 FB_SENSOR.2@5076.26,6970
SWCLK: J_SWD.4 U_MCU.25 | length 336.8
  Top Layer w10: U_MCU.25@6564.53,6056.54 6641.54,6056.54 6705,6120 J_SWD.4@6875,6120
SWDIO: J_SWD.2 U_MCU.24 | length 265.9
  Top Layer w8: U_MCU.24@6623.58,5997.48 6675,5997.48 J_SWD.2@6875,5920
USART1_RX: J_EXP.4 U_MCU.21 | length 2568.1
  Top Layer w8: J_EXP.4@5475,4075 5425,4125 5425,4225 5455,4255 5455,5115 v1(5725,5385)
  Top Layer w10: v1(6455,5895) 6545,5895 6552.99,5902.99 U_MCU.21@6623.58,5902.99
  Bottom Layer w8: v1(5725,5385) 5982.55,5642.55 5983.4,5642.55 6235.85,5895 v1(6455,5895)
USART1_TX: J_EXP.3 U_MCU.19 | length 2385.9
  Top Layer w8: J_EXP.3@5475,4175 5475,5095 v1(5765,5385) ; v1(6505,5845) 6625,5845 U_MCU.19@6623.58,5840
  Bottom Layer w8: v1(5765,5385) 6225,5845 v1(6505,5845)
USART4_RX: J_EXP.6 U_MCU.8 | length 2037.5
  Top Layer w8: J_EXP.6@5575,4075 5525,4125 5525,4805 v1(5745,5025) ; v1(6005,5295) 6005,5495 6285,5775 U_MCU.8@6285,5777.01
  Bottom Layer w8: v1(5745,5025) 6005,5285 v1(6005,5295)
USART4_TX: J_EXP.5 U_MCU.7 | length 1954
  Top Layer w8: J_EXP.5@5575,4175 5575,4340 5845,4610 v1(5845,5390) ; v1(6235,5765) 6245,5775 6245,5795 6255,5805 6285,5805 U_MCU.7@6285,5808.5
  Bottom Layer w8: v1(5845,5390) 6217.01,5762.01 6232.01,5762.01 v1(6235,5765)
USB_5V_AUX: J_EXP_PWR.1 J_EXP_PWR.2 R_EXP_PWR_EN.2 | length 221.8
  Top Layer w20: R_EXP_PWR_EN.2@4985,4154.06 J_EXP_PWR.1@5105,4175
  Top Layer w30: J_EXP_PWR.2@5105,4075 J_EXP_PWR.1@5105,4175
USB_CC1: D1.1 J1.3 R_CC1.1 | length 432.3
  Top Layer w8: J1.3@4170,5241.57 4170.79,5240.79 4299.21,5240.79 v1(4300,5240) ; D1.1@4345,5331.18 v1(4300,5331.18) 4300,5390 4315,5405 R_CC1.1@4400.47,5405
  Bottom Layer w8: v1(4300,5240) v1(4300,5331.18)
USB_CC2: D1.3 J1.4 R_CC2.1 | length 316.3
  Top Layer w8: J1.4@4170,5340 4230,5340 4290,5280 4343.71,5280 D1.3@4345,5280 4345,5225 4359.82,5210.18 R_CC2.1@4400.3,5210.18
USB_OVP_IN: Q_OVP.2 Q_OVP_DRV.2 R_BE_PU.1 R_K3.1 R_TOP_A.2 R_TOP_B.1 S1.4 TP_USB_OVP_IN.1 Z_OVP.1 | length 2928.7
  Top Layer w8: R_BE_PU.1@4415,5515.47 4417.59,5518.06 4438.06,5518.06 4460,5540 4460,5612.4 4452.4,5620 Q_OVP_DRV.2@4452.4,5676.61 ; R_K3.1@4560,5175.63 4560,5065 4595,5030 4828.06,5030 ; Q_OVP.2@4602.4,5676.61 4602.4,5620 4630,5620 ; Z_OVP.1@4630,5545 4630,5620 ; R_TOP_B.1@4890,5088.61 4890,5030 ; TP_USB_OVP_IN.1@5345,5065 5285,5065 5250,5030 4890,5030 ; 4630,5620 4765,5620 4780,5605 R_TOP_A.2@4780,5420 4817.59,5420 4828.06,5409.53 4828.06,5030 ; 4828.06,5030 4890,5030
  Top Layer w30: S1.4@4170,6040.28 4177.82,6032.46 4208.92,6032.46 4230,6011.38 4230,5650 4260,5620 4350,5620 4452.4,5620 4602.4,5620
USB_VBUS_PROT: C_USB1.2 C_USB2.2 Q_OVP.3 R_EXP_PWR_EN.1 R_PR_TOP.1 TP_USB_PROT.1 U_PMUX.3 U_PMUX.5 | length 3672.5
  Top Layer w8: 4549.69,5910 U_PMUX.3@4549.69,5980 ; Q_OVP.3@4565,5753.39 4665,5753.39 ; U_PMUX.5@4569.37,6038.27 R_PR_TOP.1@4635,6039.06 v1(4690,6039.06) 4690,5910 4665,5910 ; R_EXP_PWR_EN.1@4985,4095 4940,4095 4930,4105 4930,4270 5435,4739.56 5435,5415 5415,5435 TP_USB_PROT.1@5340,5435 5336.84,5431.84 5303.16,5431.84 5290,5445 v1(5290,5480)
  Top Layer w20: 4665,5753.39 4665,5910
  Top Layer w30: C_USB1.2@4520,5910 4549.69,5910 C_USB2.2@4615,5910 4665,5910
  Bottom Layer w8: v1(4690,6039.06) 5260.94,6039.06 5290,6010 v1(5290,5480)
USB_VBUS_RAW: J1.1 S1.3 TP_USB_RAW.1 | length 1482.2
  Top Layer w8: J1.1@4170,5044.72 4235.28,5044.72 4250,5030 4250,4850 4320,4780 TP_USB_RAW.1@4390,4780
  Top Layer w30: J1.1@4170,5044.72 4095,5044.72 4095,5941.85 S1.3@4170,5941.85
VBAT: BT2.1 TP_VBAT.1 U_RTC.14 | length 2376.8
  Top Layer w20: TP_VBAT.1@7240,4145 7240,5123.7 BT2.1@7370,5253.7
  Bottom Layer w8: U_RTC.14@6443.9,4825 6500,4825
  Bottom Layer w20: 6500,4825 7060,4825 7300,5065 7300,5253.7 BT2.1@7370,5253.7
VIN_MUX: C_IN.2 TP_VIN_MUX.1 U_PMUX.2 U_PMUX.7 U_SYS.4 U_SYS.5 | length 1562.9
  Top Layer w8: v1(4480,5950) 4530,5950 U_PMUX.2@4530,5980 U_PMUX.7@4530,6038.27 ; U_SYS.4@5224.37,5736.73 5265,5736.73 ; U_SYS.5@5224.37,5795 5265,5795
  Top Layer w12: 5265,5736.73 5280,5751.73 ; 5265,5795 5280,5795
  Top Layer w20: C_IN.2@5232.83,5875 5232.83,5845 v1(5235,5830) ; TP_VIN_MUX.1@5530,5795 TP_VIN_MUX.1@5540,5785
  Top Layer w30: 5232.83,5845 5262.83,5815 5280,5815 5280,5795 5280,5751.73
  Top Layer w40: 5280,5795 TP_VIN_MUX.1@5530,5795
  Bottom Layer w30: v1(4480,5950) 4480,5890 5235,5890 v1(5235,5830)
pads on no net: D1.4 D1.5 D1.6 D_EXT3.3 D_EXT3.4 D_NAV1.6 J_EXP.15 J_EXT. J_SD. J_SD.1 J_SD.8 U_MCU.2 U_MCU.3 U_OLED_SW.8 U_OLED_SW.9 U_OLED_SW.10 U_OLED_SW.11 U_RTC.1 U_RTC.4 U_SD_BUF.11

## Polygon pours and split planes (outlines as drawn)
GND on Bottom Layer "Bottom Layer-GND" (solid, remove dead copper, pour order 0): 4055.12,3937.01 cw(c4055.12,4055.12) 3937.01,4055.12 3937.01,6968.5 cw(c4055.12,6968.5) 4055.12,7086.61 7755.91,7086.61 cw(c7755.91,6968.5) 7874.02,6968.5 7874.02,4055.12 cw(c7755.91,4055.12) 7755.91,3937.01
GND on Top Layer "Top Layer-GND" (solid, remove dead copper, pour order 1): 4055.12,3937.01 cw(c4055.12,4055.12) 3937.01,4055.12 3937.01,6968.5 cw(c4055.12,6968.5) 4055.12,7086.61 7755.91,7086.61 cw(c7755.91,6968.5) 7874.02,6968.5 7874.02,4055.12 cw(c7755.91,4055.12) 7755.91,3937.01

## Silkscreen, mask and mechanical layers (free items; w line width, h text height)
Top Overlay:
  drawing of 996 lines, arcs and shapes, not listed
Bottom Overlay:
  lines w5: 6136.94,4725 6158.94,4735.56 6158.94,4714.44 6136.94,4725 ; 7436.28,5253.7 7458.28,5264.26 7458.28,5243.14 7436.28,5253.7

## Text inside footprints (layer, text, board x,y; h text height)
BT1: Top Overlay "1+" at 4175,4408.62 h27.56 r180
J1: Top Overlay "1+" at 4170,4916.77 h27.56 r180
J_EXP: Top Overlay "KEY15" at 6010,3970 h27.56; Top Overlay "1" at 5330,4260 h27.56
J_EXP_PWR: Top Overlay "GND" at 5190,4255 h27.56; Top Overlay "5V" at 5075,4255 h27.56
J_EXT: Top Overlay "1" at 6390,4200 h27.56 r180
J_SENSOR_PCB: Top Overlay "SDA_GND" at 4450,6905 h20 r270; Top Overlay "SDA" at 4555,6900 h27.56 r270; Top Overlay "SCL_GND" at 4650,6905 h20 r270; Top Overlay "SCL" at 4755,6900 h27.56 r270; Top Overlay "GND" at 4855,6900 h27.56 r270; Top Overlay "3V3" at 4955,6900 h27.56 r270
J_SHIELD: Top Overlay "SHIELD" at 4330,6790 h31.5 r90
S1: Top Overlay "1+" at 4170,5617.05 h27.56 r180